# EAGLE board MAVI_PCB_DISENO (EAGLE 9.7.0)
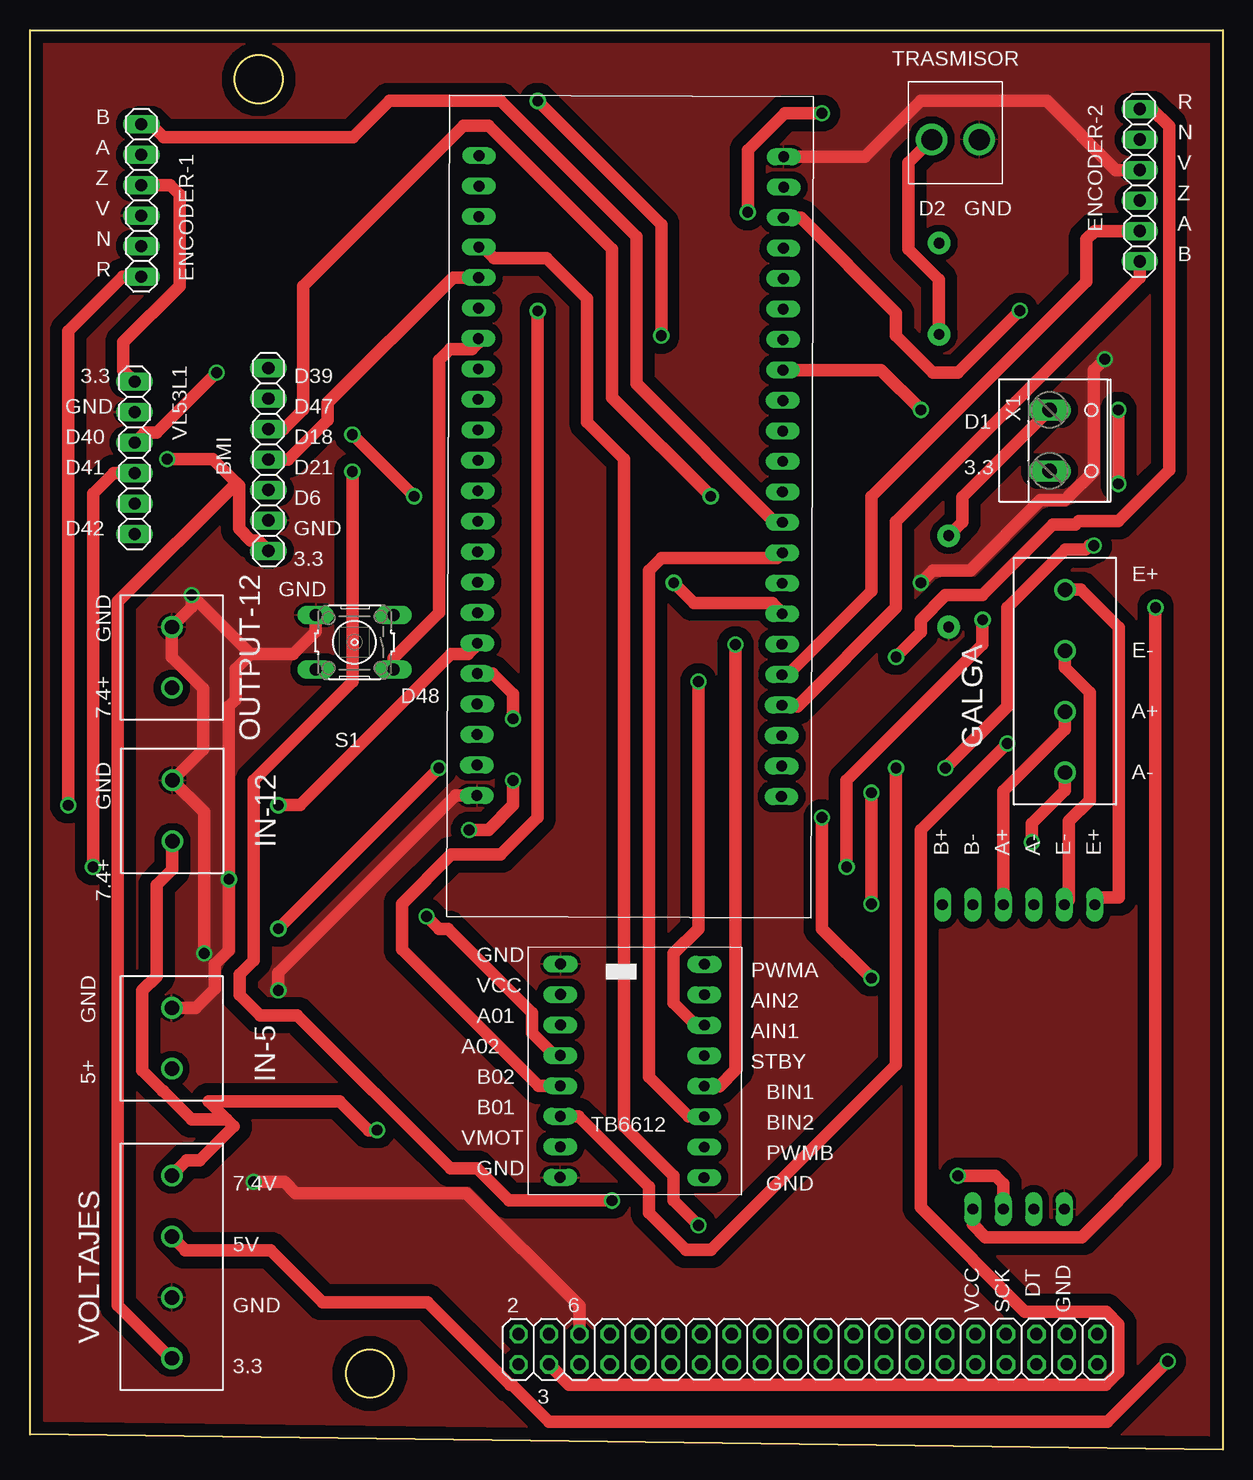
[diagram p0: board, top side]
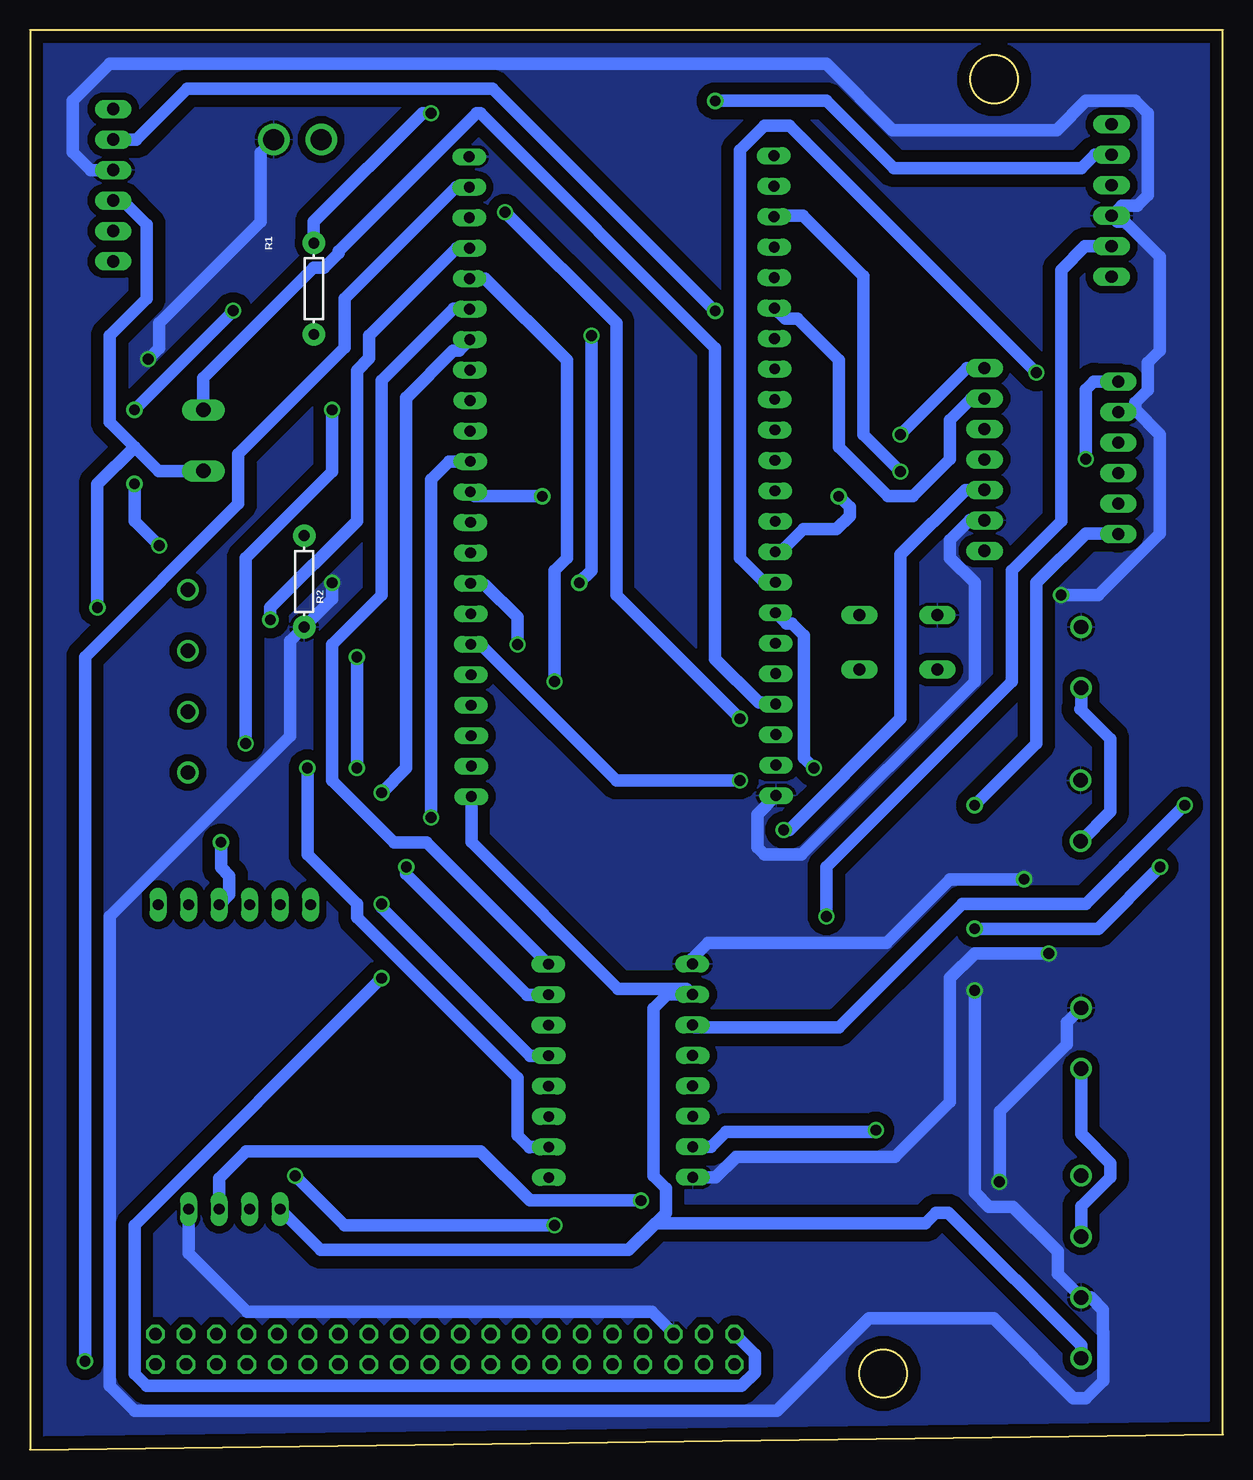
[diagram p1: board, bottom side, seen from below]

Size 99.45 x 118.35 mm. Coordinates in mm from the lower left corner, seen from the top.
Outline: 0,118.35 99.45,118.35 99.45,0 0,1.27 0,118.35
Outline: circle at 28.33,6.35 radius 2
Outline: circle at 19.07,114.24 radius 2
Copper layers (1*16): Top / Bottom
Stack-up Default Layer Stack: Top SilkScreen Epoxy Ink / Top SolderMask SR:Green 0.0254mm Dk 4.3 / Top Surface Finish Lead-Free 0.02mm / Top CuFoil:007 0.035mm / Dielectric-1 User Defined 1.5mm / Bottom CuFoil:007 0.035mm / Bottom Surface Finish Lead-Free 0.02mm / Bottom SolderMask SR:Green 0.0254mm Dk 4.3 / Bottom SilkScreen Epoxy Ink
Design rules: minimum copper width 1.06mm, minimum drill size 0.9mm, copper clearance wire_polygon to wire_polygon 1mm, copper clearance wire_polygon to pad_smd 0.4mm, copper clearance wire_polygon to via 0.5mm, copper clearance pad_smd to pad_smd 0.4mm, copper clearance pad_smd to via 0.4mm, copper clearance via to via 0.4mm, copper clearance smd to pad (same net) 0.4mm, copper clearance smd to via (same net) 0.4mm, copper clearance smd to smd (same net) 0.4mm, dimension clearance 1.01mm, via restrict clearance 0mil, restrict clearance 0mil, drill distance 0.4mm, keepout clearance 0mil

## Footprints (pad centres in the part's own frame; a part is rotated, then mirrored left to right if it is on the bottom)
1X07 = drill 1.016 long: 1 -7.62,0; 2 -5.08,0; 3 -2.54,0; 4 0,0; 5 2.54,0; 6 5.08,0; 7 7.62,0
1X06 = drill 1.016 long: A -3.81,0; B -6.35,0; N 3.81,0; R 6.35,0; V 1.27,0; Z -1.27,0
TERMBLK_508-4N = drill 1.2: A+ 10.16,0; A- 15.24,0; E+ 0,0; E- 5.08,0
TERMBLK_508-2N = drill 1.2: + 0,0; - 5.08,0
2X20 = drill 1.016 octagon: 1 -24.13,-1.27; 2 -24.13,1.27; 3 -21.59,-1.27; 4 -21.59,1.27; 5 -19.05,-1.27; 6 -19.05,1.27; 7 -16.51,-1.27; 8 -16.51,1.27; 9 -13.97,-1.27; 10 -13.97,1.27; 11 -11.43,-1.27; 12 -11.43,1.27; 13 -8.89,-1.27; 14 -8.89,1.27; 15 -6.35,-1.27; 16 -6.35,1.27; 17 -3.81,-1.27; 18 -3.81,1.27; 19 -1.27,-1.27; 20 -1.27,1.27; 21 1.27,-1.27; 22 1.27,1.27; 23 3.81,-1.27; 24 3.81,1.27; 25 6.35,-1.27; 26 6.35,1.27; 27 8.89,-1.27; 28 8.89,1.27; 29 11.43,-1.27; 30 11.43,1.27; 31 13.97,-1.27; 32 13.97,1.27; 33 16.51,-1.27; 34 16.51,1.27; 35 19.05,-1.27; 36 19.05,1.27; 37 21.59,-1.27; 38 21.59,1.27; 39 24.13,-1.27; 40 24.13,1.27
AXIAL-0.3 = drill 0.9 pad 1.88: P$1 -3.81,0; P$2 3.81,0
B3F-10XX = drill 1.016 long: 1 -3.251,2.261; 2 3.251,2.261; 3 -3.251,-2.261; 4 3.251,-2.261
B2P-VH_396-2N = drill 1.75: 1 0,0; 2 3.96,0
TB6612FNG = drill 0.9 pad 1.422 long: A01 0,-41.91; A02 0,-44.45; AIN1 12,-41.91; AIN2 12,-39.37; B01 0,-49.53; B02 0,-46.99; BIN1 12,-46.99; BIN2 12,-49.53; GND$1 0,-54.61; GND$2 12,-54.61; GND$4 0,-36.83; PWMA 12,-36.83; PWMB 12,-52.07; STBY 12,-44.45; VCC 0,-39.37; VMOT 0,-52.07
ESP32-S3 = drill 0.9 long: 0 26.67,-34.29; 1 26.67,-8.89; 2 26.67,-11.43; 3 1.27,-31.75; 3.3V 1.27,-1.27; 3.3V1 1.27,-3.81; 4 1.27,-8.89; 5 1.27,-11.43; 5V 1.27,-52.07; 6 1.27,-13.97; 7 1.27,-16.51; 8 1.27,-29.21; 9 1.27,-36.83; 10 1.27,-39.37; 11 1.27,-41.91; 12 1.27,-44.45; 13 1.27,-46.99; 14 1.27,-49.53; 15 1.27,-19.05; 16 1.27,-21.59; 17 1.27,-24.13; 18 1.27,-26.67; 19 26.67,-49.53; 20 26.67,-46.99; 21 26.67,-44.45; 35 26.67,-31.75; 36 26.67,-29.21; 37 26.67,-26.67; 38 26.67,-24.13; 39 26.67,-21.59; 40 26.67,-19.05; 41 26.67,-16.51; 42 26.67,-13.97; 43 26.67,-3.81; 44 26.67,-6.35; 45 26.67,-36.83; 46 1.27,-34.29; 47 26.67,-41.91; 48 26.67,-39.37; GND 1.27,-54.61; GND1 26.67,-54.61; GND2 26.67,-52.07; GND3 26.67,-1.27; RST 1.27,-6.35
HX711 = drill 0.9 long: A+ 0,-1.27; A- 0,1.27; B+ 0,-6.35; B- 0,-3.81; DT 25.379,1.27; E+ 0,6.35; E- 0,3.81; GND 25.379,3.81; SCK 25.379,-1.27; VCC 25.379,-3.81
1X06' = drill 1.016 long: 1 -6.35,0; 2 -3.81,0; 3 -1.27,0; 4 1.27,0; 5 3.81,0; 6 6.35,0
W237-132 = drill 1.194 long: 1 -2.54,-0.635; 2 2.54,-0.635

## Placement (x,y rotation side)
BMI  PINHD-1X7  [1X07]  19.87,82.55 90 top
ENCODER-1  ENCODER  [1X06]  9.28,104.14 270 top
ENCODER-2  ENCODER  [1X06]  92.52,105.41 90 top
GALGA  CC282837-4  [TERMBLK_508-4N]  86.28,71.69 270 top
IN-5  VOLTAJE282837-2  [TERMBLK_508-2N]  11.82,31.75 90 top
IN-12  VOLTAJE282837-2  [TERMBLK_508-2N]  11.87,50.72 90 top
JP1  PINHD-2X20  [2X20]  64.86,8.38 0 top
OUTPUT-12  VOLTAJE282837-2  [TERMBLK_508-2N]  11.82,63.5 90 top
R1  10k  [AXIAL-0.3]  75.78,96.78 270 bottom
R2  10k  [AXIAL-0.3]  76.59,72.39 270 bottom
S1  [B3F-10XX]  27.06,67.31 180 top
TRASMISOR  B2P-VH  [B2P-VH_396-2N]  79.13,109.22 180 top
U$1  TB6612DEFINITIVO  [TB6612FNG]  44.29,77.32 359.9 top
U$2  ESP32-S2  [ESP32-S3]  63.92,53.17 179.8 top
U$3  HX711  [HX711]  82.41,45.43 270 top
VL53L1  PINHD-1X6  [1X06']  8.72,82.68 270 top
VOLTAJES  2828XX-4282837-4  [TERMBLK_508-4N]  11.82,7.62 90 top
X1  [W237-132]  85.63,84.14 270 top

## Library data of the parts
BMI = Connector; CATEGORY: Headers; DESCRIPTION: Header-Straight-7 Position; PACKAGE_TYPE: THT; PITCH: 0.100" (2.54mm); SUBCATEGORY: Headers-Male Pins; TYPE: Board to Board or Cable-Unshrouded-Through Hole-Straight
ENCODER-1 ENCODER-2 VL53L1 = Connector; CATEGORY: Headers; DESCRIPTION: Header-Straight-6 Position; PACKAGE_TYPE: THT; PITCH: 0.100" (2.54mm); SUBCATEGORY: Headers-Male Pins; TYPE: Board to Board or Cable-Unshrouded-Through Hole-Straight
GALGA VOLTAJES = Connector; CATEGORY: Fixed Terminal Blocks; DATASHEET: https://www.te.com/usa-en/product-282837-4.datasheet.pdf; DESCRIPTION: 4 Position Wire to Board Terminal Block Horizontal with Board 0.200" (5.08mm) Through Hole; MANUFACTURER: TE Connectivity AMP Connectors; MPN: 282837-4; OPERATING_TEMPERATURE: -40°C ~ 105°C; PACKAGE_SIZE: NA; PACKAGE_TYPE: THT; PART_STATUS: ACTIVE; PITCH: 0.200" (5.08mm); ROHS: COMPLIANT; SERIES: Buchanan; SUBCATEGORY: Terminal Blocks; TYPE: Through Hole Screw - Rising Cage Clamp Side wire entry Horizontal with Board
IN-5 IN-12 OUTPUT-12 = Connector; CATEGORY: Fixed Terminal Blocks; DATASHEET: https://www.te.com/usa-en/product-282837-2.datasheet.pdf; DESCRIPTION: 2 Position Wire to Board Terminal Block Horizontal with Board 0.200" (5.08mm) Through Hole; MANUFACTURER: TE Connectivity AMP Connectors; MPN: 282837-2; OPERATING_TEMPERATURE: -40°C ~ 105°C; PACKAGE_SIZE: NA; PACKAGE_TYPE: THT; PART_STATUS: ACTIVE; PITCH: 0.200" (5.08mm); ROHS: COMPLIANT; SERIES: Buchanan; SUBCATEGORY: Terminal Blocks; TYPE: Through Hole Screw - Rising Cage Clamp Side wire entry Horizontal with Board
JP1 = Connector; CATEGORY: Headers; DESCRIPTION: Header-Straight-2x20 Position; PACKAGE_TYPE: THT; PITCH: 0.100" (2.54mm); SUBCATEGORY: Headers-Male Pins; TYPE: Board to Board or Cable-Unshrouded-Through Hole-Straight
R1 R2 = SparkFun-Resistors; PROD_ID: RES-12183
S1 = PulseOximeterECG_AU; MPN: B3F-1000; OC_FARNELL: 176432; OC_NEWARK: 36M3542
TRASMISOR = Connector; CATEGORY: Header; DATASHEET: https://www.jst-mfg.com/product/pdf/eng/eVH.pdf; DESCRIPTION: Connector Header Through Hole 3 position 0.156" (3.96mm); MANUFACTURER: JST Sales America Inc.; MPN: B2P-VH; OPERATING_TEMPERATURE: -25°C ~ 85°C; PACKAGE_SIZE: NA; PACKAGE_TYPE: THT; PART_STATUS: ACTIVE; PITCH: 0.156" (3.96mm); ROHS: COMPLIANT; SERIES: VH; SUBCATEGORY: Rectangular Connectors; TYPE: Header-Male Pin-Board to Cable/Wire-Through Hole
U$1 = tb6612FNG
U$2 = ESP32-S3
U$3 = Biblioteca
X1 = con-wago-508; OC_FARNELL: unknown; OC_NEWARK: unknown

## Nets
GND: BMI.2 ENCODER-1.V ENCODER-2.V IN-5.- IN-12.- JP1.6 OUTPUT-12.- R2.P$2 S1.4 TRASMISOR.1 U$1.GND$1 U$1.GND$4 U$2.GND U$2.GND3 U$3.GND VL53L1.2 VOLTAJES.E-
N$1: GALGA.E+ U$3.E+
N$2: GALGA.E- U$3.E-
N$3: GALGA.A+ U$3.A+
N$4: GALGA.A- U$3.A-
N$6: IN-12.+ OUTPUT-12.+ U$1.VMOT VOLTAJES.A-
N$7: BMI.1 ENCODER-1.Z ENCODER-2.Z U$1.VCC U$2.3.3V U$3.VCC VL53L1.1 VOLTAJES.E+ X1.2
N$8: U$2.19 U$3.DT
N$10: ENCODER-1.R U$1.A01
N$11: ENCODER-1.N U$1.A02
N$12: ENCODER-2.N U$1.B02
N$13: ENCODER-2.R U$1.B01
N$14: U$1.PWMA U$2.11
N$15: U$1.AIN2 U$2.13
N$16: U$1.AIN1 U$2.12
N$17: U$1.STBY U$2.10
N$18: U$1.BIN1 U$2.15
N$19: U$1.BIN2 U$2.16
N$20: U$1.PWMB U$2.14
N$21: JP1.3 U$2.9
N$22: JP1.2 U$2.8
N$23: ENCODER-2.B U$2.4
N$24: ENCODER-2.A U$2.5
N$25: ENCODER-1.B U$2.17
N$26: ENCODER-1.A U$2.7
N$28: U$2.20 U$3.SCK
N$29: U$2.40 VL53L1.3
N$30: U$2.41 VL53L1.4
N$31: U$2.42 VL53L1.6
N$32: R1.P$1 U$2.2
N$33: R1.P$2 TRASMISOR.2
N$34: R2.P$1 U$2.1 X1.1
N$35: BMI.3 U$2.6
N$36: IN-5.+ U$2.5V VOLTAJES.A+
N$37: BMI.4 U$2.21
N$38: BMI.5 U$2.18
N$39: BMI.6 U$2.47
N$40: BMI.7 U$2.39
N$41: S1.1 U$2.48

## Tracks (layer width: path | path; a pad name or v marks a point on that pad's centre or on a via)
GND  (via drill 0.9)
  Top 1.06: 18.4,66.33 v13.49,71.24 13.49,70.25 OUTPUT-12.- 11.82,66.09 14.45,63.46 14.45,58.38 IN-12.- 14.52,53.14 v14.52,41.37 | S1.4 23.81,68.2 21.94,66.33 18.4,66.33 | 18.4,66.33 17.13,65.06 17.13,62.52 16.58,61.97 v16.58,47.55 16.58,41.64 15.41,40.47 15.41,38.41 13.81,36.81 11.83,36.81 IN-5.- | v18.64,22.32 21.21,22.32 22.15,21.38 36.41,21.38 45.8,12 JP1.6 | ENCODER-2.V 90.53,106.68 84.78,112.44 74.26,112.44 69.59,107.78 U$2.GND | v74.26,72.27 75.29,73.3 78.38,73.3 84.24,79.16 86.28,79.16 86.6,79.48 86.62,79.48 88.68,81.54 88.68,90.01 v89.6,90.92 | v20.7,38.28 20.7,39.75 35.48,54.53 U$2.GND3
  Bottom 1.06: v16.58,47.55 22.76,47.55 28.06,42.25 42.92,42.25 44.23,40.94 U$1.GND$4 | 7.31,86.69 5.25,84.63 5.25,76.39 10.4,71.24 v13.49,71.24 | 7.31,86.69 7.31,87.28 6.27,88.33 6.27,90.61 5.25,91.62 5.25,99.45 8.19,102.39 8.8,102.39 ENCODER-1.V 8.43,103.72 7.15,103.72 6.28,104.58 6.28,111.41 7.31,112.44 11.43,112.44 13.86,110.01 27.54,110.01 33.06,115.53 92.8,115.53 95.89,112.44 95.89,108.17 94.39,106.67 ENCODER-2.V | v18.64,22.32 18.62,22.34 18.62,28.19 13.02,33.78 13.02,35.63 IN-5.- | U$3.GND 86.22,16.38 81.34,11.5 47.62,11.5 45.8,9.69 JP1.6 | VL53L1.2 7.51,86.48 7.31,86.69 | v14.52,41.37 20.7,41.37 22.76,39.31 22.76,29.01 27.34,24.43 40.57,24.43 42.29,22.71 U$1.GND$1 | v74.26,72.27 74.26,70.91 R2.P$2 77.75,67.41 77.75,59.5 92.8,44.46 92.8,5.32 90.74,3.26 37.18,3.26 29.5,10.94 19.11,10.94 12.46,4.29 11.43,4.29 9.99,5.73 9.99,9.77 9.99,11.68 11.02,12.7 VOLTAJES.E- 13.77,14.65 13.77,16.52 17.5,20.26 19.49,20.26 20.7,21.47 v20.7,38.28 | BMI.2 21.09,77.47 21.1,77.48 22.76,75.81 22.76,74.33 20.7,72.27 20.7,64.03 35.12,49.61 38.21,49.61 38.82,50.21 38.82,52.97 U$2.GND3 | TRASMISOR.1 80.21,108.14 80.21,102.37 88.68,93.9 88.68,91.84 v89.6,90.92
  pour Bottom (isolate 0.61): -0.08,117.75 99.24,117.75 99.24,-0.08 98.93,-0.4 2.09,-0.4 -0.39,2.09 -0.39,117.3 0.24,117.94 0.24,118.01 0.46,117.8 0.46,117.72
  pour Top (isolate 0.61): 0.44,117.89 98.61,117.89 98.98,117.53 98.98,0.21 99.14,0.05 1.96,0.05 0.49,1.52 0.49,117.84
N$1
  Top 1.06: GALGA.E+ 87.6,71.69 90.78,68.52 90.78,46.03 89.37,46.03 U$3.E+
N$2
  Top 1.06: GALGA.E- 86.28,65.2 88.36,63.13 88.36,54.13 86.62,52.4 86.62,45.83 U$3.E-
N$3
  Top 1.06: GALGA.A+ 86.28,60.04 81.14,54.89 81.14,45.44 U$3.A+
N$4  (via drill 0.9)
  Top 1.06: v83.53,50.64 83.53,52.22 86.28,54.97 GALGA.A-
  Bottom 1.06: v83.53,50.64 83.53,48.53 82.84,47.84 82.84,46.27 U$3.A-
N$6  (via drill 0.9)
  Top 1.06: 16.41,27.54 13.49,27.54 11.11,29.92 11.06,29.92 9.37,31.61 9.37,38.28 10.55,39.46 10.55,47.06 11.87,48.38 IN-12.+ | 16.41,27.54 14.89,29.05 25.81,29.05 28.23,26.63 v28.94,26.63 | 16.41,27.54 17,26.95 14.16,24.11 13.07,24.11 VOLTAJES.A-
  Bottom 1.06: U$1.VMOT 42.66,25.25 41.42,26.49 29.09,26.49 v28.94,26.63 | OUTPUT-12.+ 11.82,61.82 11.88,61.75 9.37,59.24 9.37,53.21 IN-12.+
N$7  (via drill 0.9)
  Top 1.06: 17.22,80.59 15.24,82.57 v11.43,82.57 | v93.83,70.21 93.83,23.86 87.69,17.72 79.65,17.72 78.6,18.77 U$3.VCC | 17.22,80.59 7.31,70.69 7.31,12.04 11.72,7.62 VOLTAJES.E+ | 17.22,80.59 17.42,80.39 17.42,76.77 18.41,75.78 19.03,75.78 BMI.1 | ENCODER-1.Z 11.68,105.41 12.46,104.62 12.46,96.99 7.79,92.31 7.79,89.96 VL53L1.1
  Bottom 1.06: v11.43,82.57 11.43,88.38 10.76,89.05 10.73,89.03 VL53L1.1 | 90.74,83.6 88.73,81.59 X1.2 | 90.74,83.6 92.8,85.66 92.8,92.87 89.71,95.96 89.71,102.14 91.71,104.14 ENCODER-2.Z | 47.3,18.88 46.45,19.74 46.45,21.8 47.48,22.83 47.48,36.77 46.31,37.95 U$1.VCC 44.7,38.43 50.42,38.43 62.65,50.66 U$2.3.3V | 47.3,18.88 49.54,16.65 75.22,16.65 75.22,16.66 U$3.VCC | 47.3,18.88 24.8,18.88 23.94,19.74 22.88,19.74 11.82,8.69 VOLTAJES.E+ | 90.74,83.6 93.83,80.51 v93.83,70.21
N$8  (via drill 0.9)
  Top 1.06: v26.88,81.54 26.88,64.03 18.64,55.79 18.64,40.78 17.48,39.62 17.48,37.91 19.17,36.22 22.27,36.22 35.04,23.45 37.27,23.45 39.94,20.77 v48.51,20.77
  Bottom 1.06: v48.51,20.77 57.78,20.77 61.9,24.89 81.42,24.89 83.68,22.63 U$3.DT | v26.88,81.54 29.97,84.63 29.97,97.83 35.02,102.88 37.33,102.88 U$2.19
N$10  (via drill 0.9)
  Top 1.06: v3.19,53.73 3.19,93.24 7.74,97.79 ENCODER-1.R
  Bottom 1.06: v3.19,53.73 8.24,48.67 8.24,48.66 11.42,45.49 21.73,45.49 32.03,35.19 44,35.19 U$1.A01
N$11  (via drill 0.9)
  Top 1.06: U$1.A02 43.73,32.87 41.87,34.73 41.87,36.42 34.86,43.43 34.09,43.43 v33.06,44.45
  Bottom 1.06: ENCODER-1.N 11.5,100.33 13.49,98.34 13.49,77.42 17.61,73.3 17.61,64.03 33.06,48.58 v33.06,44.45
N$12  (via drill 0.9)
  Top 1.06: v42.33,94.93 42.33,52.7 39.24,49.61 35.12,49.61 31,45.49 31,41.72 42.39,30.33 U$1.B02
  Bottom 1.06: v42.33,94.93 60.87,113.47 86.36,113.47 90.61,109.22 ENCODER-2.N
N$13  (via drill 0.9)
  Top 1.06: v72.2,56.82 72.2,32.1 56.75,16.65 54.69,16.65 51.6,19.74 51.6,21.93 45.74,27.79 U$1.B01 | v72.2,66.09 74.26,68.15 74.26,69.18 76.32,71.24 79.41,71.24 85.27,77.1 87.13,77.1 87.45,77.42 90.74,77.42 94.97,81.65 94.97,110.33 93.53,111.76 ENCODER-2.R
  Bottom 1.06: v72.2,66.09 v72.2,56.82
N$14
  Bottom 1.06: U$1.PWMA 66.4,50.64 69.11,50.64 74.26,55.79 74.26,67.12 70.14,71.24 70.14,89.11 64.14,95.12 62.83,95.12 U$2.11
N$15  (via drill 0.9)
  Top 1.06: v79.41,69.18 79.41,67.12 68.08,55.79 v68.08,48.58
  Bottom 1.06: v79.41,69.18 79.41,70.21 72.2,77.42 72.2,89.97 71.17,91 71.17,92.87 63.88,100.16 U$2.13 | U$1.AIN2 58.02,37.93 68.08,47.98 v68.08,48.58
N$16  (via drill 0.9)
  Top 1.06: v55.72,64.03 55.72,43.43 53.66,41.37 53.66,37.25 55.52,35.39 U$1.AIN1
  Bottom 1.06: v55.72,64.03 55.72,73.3 54.69,74.33 54.69,90.81 61.5,97.62 U$2.12
N$17  (via drill 0.9)
  Top 1.06: v70.14,45.49 v70.14,54.76
  Bottom 1.06: v70.14,54.76 68.08,56.82 68.08,87.72 68.07,87.72 64.16,91.63 63.69,91.63 U$2.10 | v70.14,45.49 70.14,45.23 57.76,32.85 U$1.STBY
N$18  (via drill 0.9)
  Top 1.06: v58.81,67.12 58.81,31.65 57.46,30.31 U$1.BIN1
  Bottom 1.06: v58.81,67.12 58.81,69.41 61.5,72.1 62.59,72.1 U$2.15
N$19
  Top 1.06: U$1.BIN2 54.9,27.77 51.6,31.07 51.6,73.3 52.63,74.33 62.29,74.33 U$2.16
N$20  (via drill 0.9)
  Top 1.06: v90.74,80.51 v90.74,86.69 | v76.32,56.82 81.47,61.97 81.47,70.21 86.3,75.04 87.99,75.04 88.3,75.36 v88.68,75.36 | U$2.14 64.26,102.7 72.2,94.77 72.2,92.87 75.29,89.78 77.35,89.78 v82.51,94.94
  Bottom 1.06: v90.74,80.51 90.74,77.42 v88.68,75.36 | v76.32,56.82 76.32,49.61 72.2,45.49 72.2,44.37 58.81,30.98 58.81,26.21 57.8,25.2 57.77,25.23 U$1.PWMB | v82.51,94.94 82.51,94.92 v90.74,86.69
N$21  (via drill 0.9)
  Top 1.06: v74.26,86.69 70.95,90 U$2.9 | v81.47,58.88 74.26,51.67 74.26,20.2 82.96,11.5 89.71,11.5 90.74,10.47 90.74,6.47 89.69,5.42 44.96,5.42 JP1.3
  Bottom 1.06: v74.26,86.69 74.26,81.54 81.47,74.33 v81.47,58.88
N$22  (via drill 0.9)
  Top 1.06: v66.02,52.7 66.02,43.43 v70.14,39.31
  Bottom 1.06: v66.02,52.7 66.02,80.86 64.5,82.38 U$2.8 | v70.14,39.31 90.74,18.71 90.74,6.35 89.71,5.32 40.12,5.32 39.03,6.41 39.03,7.97 40.71,9.65 JP1.2
N$23
  Top 1.06: ENCODER-2.B 92.53,99.05 92.53,97.69 72.2,77.36 72.2,70.21 63.96,61.97 63.87,62.06 U$2.4
N$24
  Top 1.06: ENCODER-2.A 88.77,101.6 88.08,100.91 88.08,97.38 70.14,79.44 70.14,71.57 63.18,64.6 U$2.5
N$25
  Top 1.06: ENCODER-1.B 10.07,110.49 11.15,109.41 26.94,109.41 29.97,112.44 39.24,112.44 50.57,101.11 50.57,88.86 62.12,77.3 U$2.17
N$26  (via drill 0.9)
  Top 1.06: v52.63,92.87 52.63,102.14 v42.33,112.44 | v53.66,72.27 55.34,70.59 61.88,70.59 62.7,69.77 U$2.7
  Bottom 1.06: v53.66,72.27 52.63,73.3 v52.63,92.87 | v42.33,112.44 33.06,112.44 27.43,106.81 11.81,106.81 10.67,107.95 ENCODER-1.A
N$28  (via drill 0.9)
  Top 1.06: v55.72,18.71 53.66,20.77 53.66,22.83 49.54,26.95 49.54,82.57 46.45,85.66 46.45,95.96 43.07,99.34 38.69,99.34 37.77,100.25 U$2.20 | v77.35,22.83 80.48,22.83 81.14,22.17 U$3.SCK
  Bottom 1.06: v55.72,18.71 73.23,18.71 v77.35,22.83
N$29  (via drill 0.9)
  Top 1.06: VL53L1.3 9.57,84.79 10.56,84.79 v15.55,89.78
  Bottom 1.06: v15.55,89.78 36.15,110.38 38.21,110.38 40.27,108.32 40.27,74.33 38.21,72.27 38.17,72.31 U$2.40
N$30  (via drill 0.9)
  Top 1.06: v20.7,43.43 v34.09,56.82 | v5.25,48.58 5.25,79.69 6.96,81.41 VL53L1.4
  Bottom 1.06: v34.09,56.82 34.92,57.65 34.92,67.88 35.91,68.87 36.4,68.87 U$2.41 | v20.7,43.43 10.4,43.43 v5.25,48.58
N$31  (via drill 0.9)
  Top 1.06: v20.7,53.73 22.52,53.73 35.12,66.33 36.52,66.33 37.3,67.11 U$2.42
  Bottom 1.06: v20.7,53.73 15.55,58.88 15.55,72.27 11.43,76.39 8.78,76.39 VL53L1.6
N$32  (via drill 0.9)
  Top 1.06: v40.27,60.94 40.27,63 38.58,64.69 U$2.2 | v59.84,103.17 59.84,108.32 62.93,111.41 v66.02,111.41
  Bottom 1.06: v40.27,60.94 50.57,71.24 50.57,93.9 v59.84,103.17 | v66.02,111.41 66.73,111.41 75.78,102.36 R1.P$1
N$33
  Top 1.06: TRASMISOR.2 73.23,107.29 73.23,100.08 75.78,97.53 R1.P$2
N$34
  Top 1.06: R2.P$1 77.74,77.35 77.74,79.42 X1.1
  Bottom 1.06: U$2.1 37.4,62.27 38.69,62.27 42.33,65.91 42.33,91.84 61.9,111.41 62.23,111.41 73.72,99.91 73.72,99.74 74.93,98.53 75.81,98.53 85,89.34 X1.1
N$35  (via drill 0.9)
  Top 1.06: v40.27,55.79 40.27,53.73 38.21,51.67 v36.61,51.67
  Bottom 1.06: v40.27,55.79 50.57,55.79 61.9,67.12 62.67,67.12 U$2.6 | BMI.3 21.48,80.01 26.88,74.61 26.88,60.94 36.15,51.67 v36.61,51.67
N$36  (via drill 0.9)
  Top 1.06: v94.86,7.38 89.82,2.34 43.25,2.34 40.18,5.42 40.02,5.42 33.14,12.3 24.38,12.3 20.07,16.61 12.95,16.61 12.95,16.66 VOLTAJES.A+
  Bottom 1.06: v94.86,7.38 94.86,66.09 82.09,78.86 82.09,82.99 73.23,91.85 73.23,95.96 63.95,105.24 U$2.5V | IN-5.+ 11.82,26.31 9.37,23.86 9.37,22.72 11.82,20.27 VOLTAJES.A+
N$37
  Top 1.06: U$2.21 35.26,97.71 24.82,87.28 24.82,85.84 21.53,82.55 BMI.4
N$38  (via drill 0.9)
  Top 1.06: v56.75,79.48 48.51,87.72 48.51,100.08 38.21,110.38 36.15,110.38 22.76,96.99 22.76,86.69 21.16,85.09 BMI.5
  Bottom 1.06: v56.75,79.48 62.38,79.48 U$2.18
N$39
  Bottom 1.06: BMI.6 20.97,87.63 22.76,85.83 22.76,82.57 25.85,79.48 27.91,79.48 32.03,83.6 32.03,90.81 35.49,94.27 36.49,94.27 U$2.47
N$40  (via drill 0.9)
  Top 1.06: v26.88,84.63 v32.03,79.48
  Bottom 1.06: v32.03,79.48 31.12,78.56 31.12,77.85 32.23,76.73 34.97,76.73 36.85,74.85 U$2.39 | v26.88,84.63 21.34,90.17 BMI.7
N$41
  Top 1.06: U$2.48 37.38,92.27 36.85,91.73 35.01,91.73 34.09,90.81 34.09,69.77 30.31,65.99 S1.1

## Text on the board
NamesTop: B | R | A | N | Z | V | V | D2 | GND | Z | N | A | R | B | 3.3 | D39 | GND | D47 | D1 | D40 | D18 | D41 | D21 | 3.3 | D6 | D42 | GND | 3.3 | GND | E+ | GND | E- | D48 | 7.4+ | A+ | A- | GND | B+ | B- | A+ | A- | E- | E+ | 7.4+ | GND | PWMA | VCC | AIN2 | A01 | GND | AIN1 | A02 | STBY | B02 | 5+ | BIN1 | B01 | BIN2 | VMOT | PWMB | GND | 7.4V | GND | 5V | GND | 2 | 6 | DT | VCC | SCK | GND | 3.3 | 3